# Altium PCB TYPEC_4KRECEIVER-v1.0.PcbDoc (part 12 of 12)
Units mil, origin at the board's own origin, x right, y up, seen from the top; angles counter-clockwise.
Board outline 2834.7 x 1259.84 mil, 10 copper layers (Top Layer, GND-1, Signal L1, GND-2, PWR-1, PWR-2, GND-3, Signal L2, GND-4, Bottom Layer), stack 61.686 mil thick; 492 components, 339 nets, 2214 pads, 1169 vias.
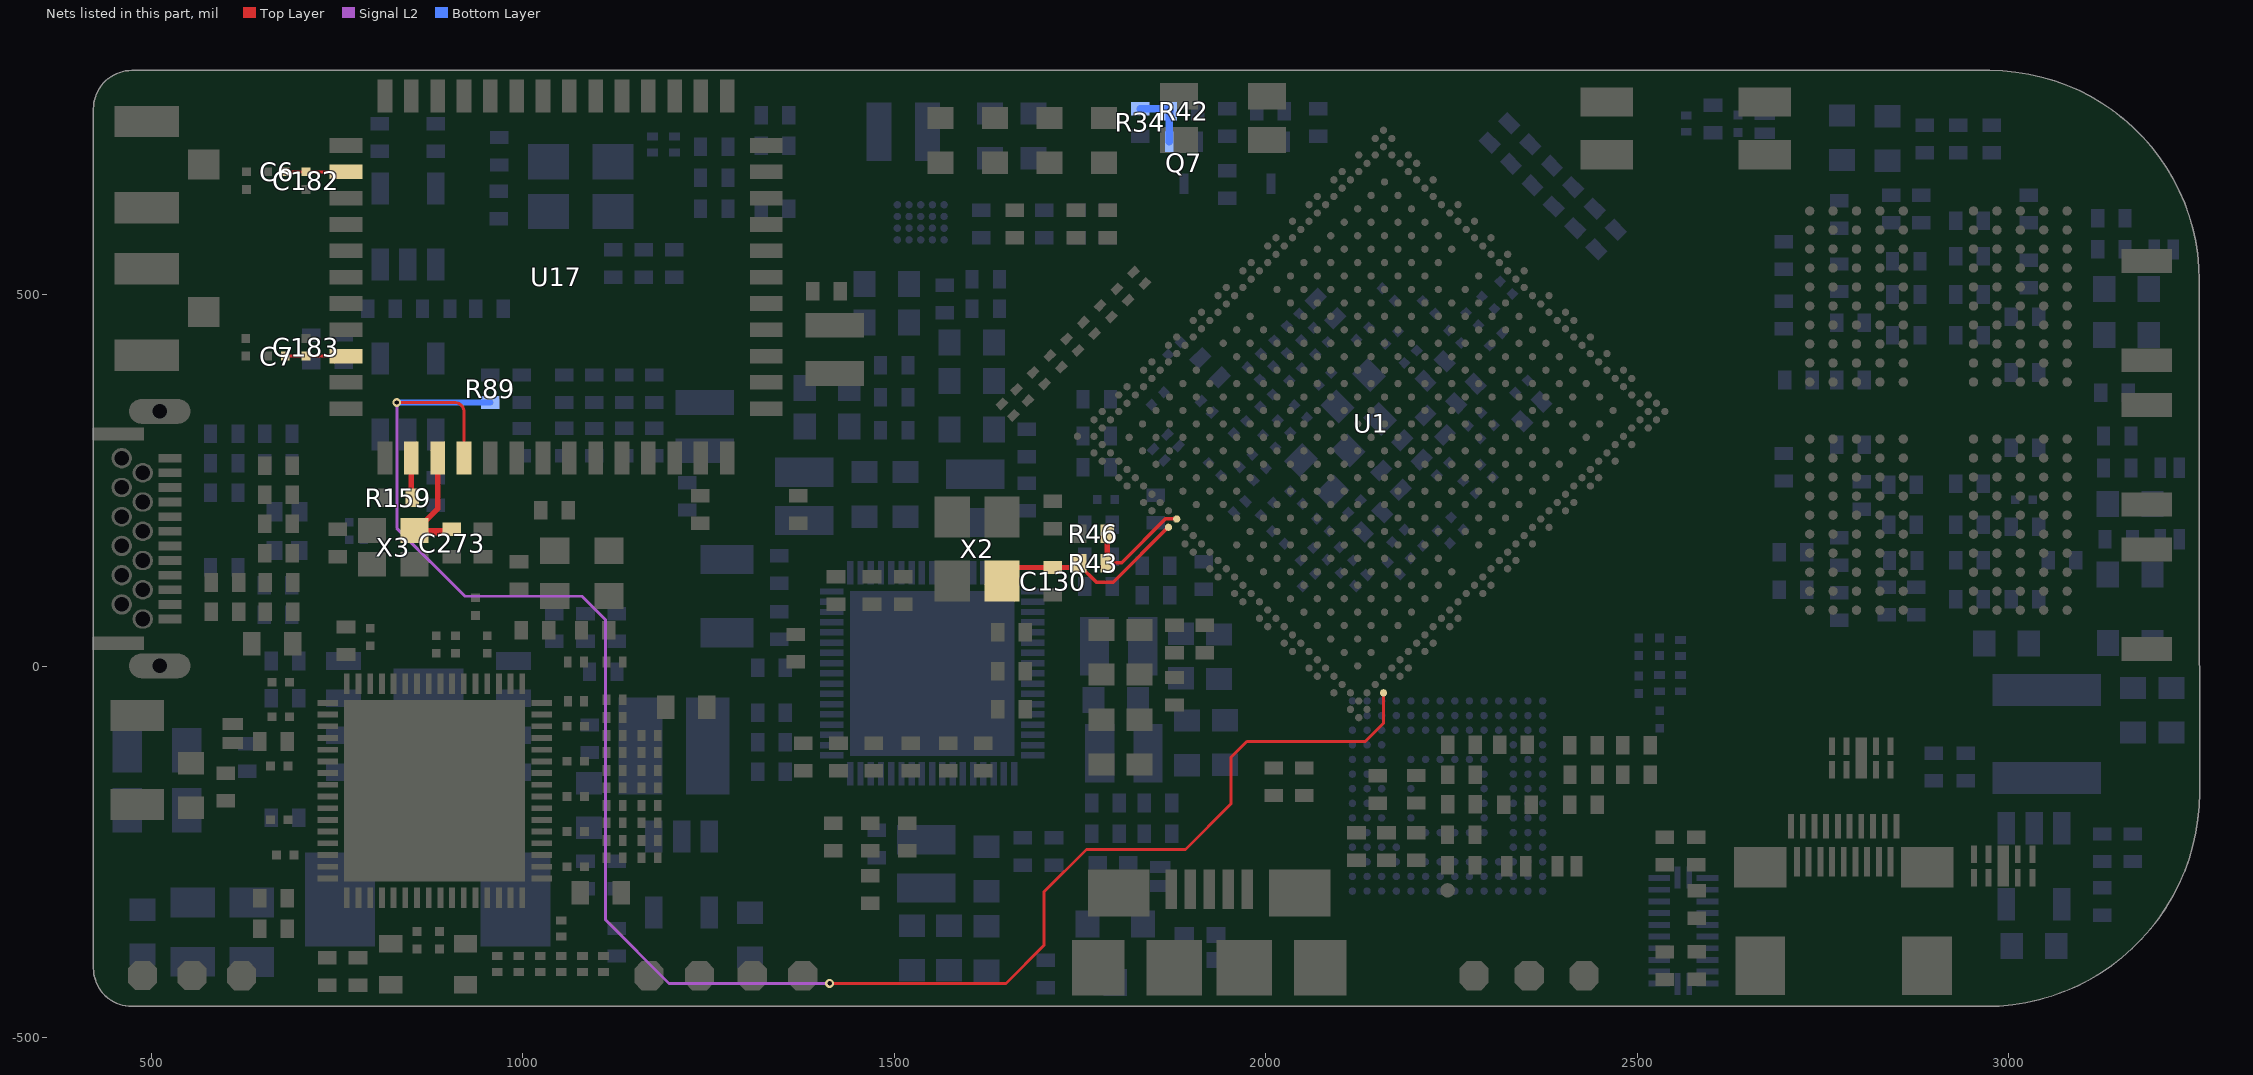
[diagram p17: the nets of this part, all layers, seen from the top]

## Via types
v1: diameter 11.81, hole 5.91, Top Layer to Bottom Layer, tented both sides, 698 vias
v2: diameter 15.75, hole 7.87, Top Layer to Bottom Layer, tented both sides, 248 vias
v3: diameter 11.81, hole 5.91, Top Layer to Signal L1, tented both sides, 121 vias
v4: diameter 11.81, hole 5.91, Top Layer to Bottom Layer, 44 vias
v5: diameter 11.81, hole 5.91, Signal L2 to Bottom Layer, 41 vias
v6: diameter 11.81, hole 5.91, Top Layer to Signal L1, 17 vias

## Nets (pads, with @x,y where several pads share a name; then routed paths per layer and width w, separated by ;. In a path a pad name is that pad's centre, name@x,y a point inside that pad or via, vN(x,y) a via of type N, cw(c..) or ccw(c..) an arc to the next point about the centre after c; other vN are vias at no path point) (continued)
WIFI_REG_ON: R89.2 U1.A35 U17.15 | length 2538.4
  Top Layer w4: v1(830.73,354.73) 908.64,354.73 cw(c908.64,342.29) 921.08,342.29 U17.15@921.08,279.73 ; v1(1413.13,-427.18) 1650.55,-427.18 1701.47,-376.26 1701.47,-304.35 1758.95,-246.87 1892.06,-246.87 1953.18,-185.74 1953.18,-123.23 1974.75,-101.66 2134.24,-101.66 2158.75,-77.15 U1.A35@2158.75,-36.08
  Signal L2 w4: v1(830.73,354.73) 830.73,185.55 922.4,93.87 1079.95,93.87 1111.74,62.08 1111.74,-341.94 1196.97,-427.18 v1(1413.13,-427.18)
  Bottom Layer w8: v1(830.73,354.73) R89.2@956.65,354.73
WIFI_XTAL_IN: R159.2 U17.13 | length 53.2
  Top Layer w7: R159.2@850.21,230.05 U17.13@850.21,279.73 ; R159.2@855.35,226.73 R159.2@855.35,230.23
WIFI_XTAL_OUT: C273.2 U17.14 X3.1 | length 156.6
  Top Layer w7: X3.1@854.4,182.15 856.37,182.15 885.65,211.44 U17.14@885.65,279.73
  Top Layer w10: X3.1@855.66,180.89 C273.2@900.64,180.89
WL_ANT0: C6.1 C182.2 U17.2 | length 81.6
  Top Layer w4.2: C6.1@680.6,665.16 C182.2@708.29,665.16 U17.2@762.22,665.16
WL_ANT1: C7.1 C183.2 U17.9 | length 81.6
  Top Layer w4.2: C7.1@680.6,417.13 C183.2@708.29,417.13 U17.9@762.22,417.13
WORK_LED: Q7.1 R34.1 R42.2 | length 82.8
  Bottom Layer w10: R34.1@1831.36,750.23 1867.63,750.23 R42.2@1871.01,746.85 ; Q7.1@1870.39,705.5 1870.39,745.49 R42.2@1871.63,746.73
XIN24M: R43.2 R46.1 U1.AD37 | length 156.4
  Top Layer w4: U1.AD37@1879.64,197.05 U1.AD37@1880.36,197.77
  Top Layer w4.7: R43.2@1789.13,139.07 1806.16,139.07 1864.98,197.89 U1.AD37@1880.24,197.89
  Top Layer w7: R46.1@1786.78,178.03 1786.78,141.42 R43.2@1789.13,139.07
XOUT24M: C130.2 R43.1 U1.AD38 X2.3 | length 275.7
  Top Layer w4.7: R43.1@1749.43,135.82 1772.37,112.88 1794.73,112.88 U1.AD38@1869.69,187.84
  Top Layer w7: X2.3@1645.25,114.22 1663.56,132.53 1744.28,132.53 1749.78,138.03 R43.1@1749.78,138.53
pads on no net: J2.4 J7.2 U1.1A4 U1.1A13 U1.1A15 U1.1A17 U1.1A18 U1.1B13 U1.1B17 U1.1B20 U1.1C2 U1.1C15 U1.1D2 U1.1D19 U1.1D20 U1.1E19 U1.1E20 U1.1F18 U1.1F19 U1.1H3 U1.1H19 U1.1H20 U1.1J19 U1.1J20 U1.1K19 U1.1K20 U1.1L1 U1.1L2 U1.1N1 U1.1N2 U1.1N20 U1.1P2 U1.1P3 U1.1P4 U1.1P18 U1.1R1 U1.1R2 U1.1R16 U1.1R17 U1.1R18 U1.1T1 U1.1T2 U1.1T4 U1.1T6 U1.1T18 U1.1T19 U1.1T20 U1.1U1 U1.1U3 U1.1U4 U1.1U5 U1.1U6 U1.1U7 U1.1U8 U1.1U9 U1.1U11 U1.1U19 U1.1U20 U1.1V2 U1.1V3 U1.1V6 U1.1V8 U1.1V9 U1.1V11 U1.1V15 U1.1V16 U1.1V20 U1.A22 U1.A26 U1.AA37 U1.AA38 U1.AB1 U1.AB2 U1.AB37 U1.AB38 U1.AC2 U1.AD1 U1.AE2 U1.AF1 U1.AF2 U1.AF37 U1.AG2 U1.AG37 U1.AH2 U1.AJ1 U1.AJ2 U1.AJ38 U1.AK2 U1.AK37 U1.AL1 U1.AL2 U1.AM1 U1.AM2 U1.AM37 U1.AM38 U1.AN2 U1.AN37 U1.AN38 U1.AP1 U1.AP3 U1.AP4 U1.AP5 U1.AP6 U1.AP7 U1.AP9 U1.AP10 U1.AP12 U1.AP14 U1.AP15 U1.AP17 U1.AP18 U1.AP20 U1.AP21 U1.AP23 U1.AP24 U1.AP26 U1.AP27 U1.AP29 U1.AP30 U1.AR2 U1.AR4 U1.AR6 U1.AR7 U1.AR9 U1.AR10 U1.AR14 U1.AR15 U1.AR17 U1.AR18 U1.AR20 U1.AR21 U1.AR23 U1.AR24 U1.AR26 U1.AR27 U1.AR29 U1.AR30 U1.B22 U1.B26 U1.C37 U1.D37 U1.G38 U1.J37 U1.J38 U1.K37 U1.K38 U1.M37 U1.M38 U1.N37 U1.N38 U1.T37 U1.V37 U1.V38 U1.W37 U1.W38 U1.Y1 U1.Y2 U2.14 U2.15 U2.16 U2.17 U2.19 U2.20 U2.21 U2.22 U3.A1 U3.A2 U3.A7 U3.A8 U3.A9 U3.A10 U3.A11 U3.A12 U3.A13 U3.A14 U3.B1 U3.B7 U3.B8 U3.B9 U3.B10 U3.B11 U3.B12 U3.B13 U3.B14 U3.C1 U3.C3 U3.C5 U3.C7 U3.C8 U3.C9 U3.C10 U3.C11 U3.C12 U3.C13 U3.C14 U3.D1 U3.D2 U3.D3 U3.D4 U3.D12 U3.D13 U3.D14 U3.E1 U3.E2 U3.E3 U3.E5 U3.E8 U3.E9 U3.E10 U3.E12 U3.E13 U3.E14 U3.F1 U3.F2 U3.F3 U3.F10 U3.F12 U3.F13 U3.F14 U3.G1 U3.G2 U3.G3 U3.G10 U3.G12 U3.G13 U3.G14 U3.H1 U3.H2 U3.H3 U3.H12 U3.H13 U3.H14 U3.J1 U3.J2 U3.J3 U3.J12 U3.J13 U3.J14 U3.K1 U3.K2 U3.K3 U3.K6 U3.K7 U3.K10 U3.K12 U3.K13 U3.K14 U3.L1 U3.L2 U3.L3 U3.L12 U3.L13 U3.L14 U3.M1 U3.M2 U3.M3 U3.M7 U3.M8 U3.M9 U3.M10 U3.M11 U3.M12 U3.M13 U3.M14 U3.N3 U3.N6 U3.N7 U3.N8 U3.N9 U3.N10 U3.N11 U3.N12 U3.N13 U3.N14 U3.P1 U3.P2 U3.P7 U3.P8 U3.P9 U3.P10 U3.P11 U3.P12 U3.P13 U3.P14 U7.32 U7.34 U7.39 U7.40 U7.41 U7.42 U7.43 U7.60 U12.A1 U12.A2 U12.A11 U12.A12 U12.AA1 U12.AA12 U12.AB1 U12.AB2 U12.AB11 U12.AB12 U12.B1 U12.B12 U12.G11 U12.K5 U12.K8 U12.N5 U12.N8 U17.12 U17.33 U17.35 U17.37 U17.44 U17.45 U17.46 U17.47 U17.48 U18.26 U18.36 U18.37 U18.44 U18.45 U18.51 U18.52 U18.61 U18.62

## Polygon pours and split planes (outlines as drawn)
VCCIO_FLASH on Signal L2 "VCCIO_FLASH_L08_P083" (solid, pour order 83): 2161.48,-106.72 2165.59,-110.83 2231.5,-110.83 2237.34,-116.67 2237.34,-193.42 2244.71,-200.79 2339.83,-200.79 2345.89,-194.73 2345.89,-68.17 2339.22,-61.5 2165.31,-61.5 2161.48,-65.33
GND on Signal L2 "GND_L08_P059" (solid, remove dead copper, pour order 59): 631.36,737.47 685.9,792.02 1240.03,792.02 1290.53,741.52 3034.41,741.52 3171.08,604.85 3171.08,-37.29 3158.57,-49.8 2506.85,-49.8 2506.85,-458.27 2969.38,-458.27 ccw(c2969.34,-170.57) 3257.05,-170.52 3257,171.83 3256.7,519.23 ccw(c2974.41,519.28) 2974.44,801.57 422.36,801.57 422.36,-458.27 631.36,-458.27 1173.48,-458.27 1173.48,-435.89 1072.65,-335.06 631.36,-335.06
VCCA_1V8 on Signal L2 "SIG6-VCCA_1V8" (solid, remove dead copper, pour order 35): 2021.43,225.31 2034.68,212.07 2046.38,212.07 2186.56,352.26 2246.69,352.26 2280.02,385.59 2280.02,422.37 2295.3,437.65 2368.23,364.72 2368.23,334.87 2351.29,334.87 2196.9,180.49 2197.36,180.04 2197.36,24.48 2189.07,16.2 2038,16.2 2028.98,25.23 2028.98,105.95 1959.47,175.46 1806.93,175.46 1806.93,225.31
VDDA_0V9 on Signal L2 "VDDA_0V9_L08_P069" (solid, pour order 69): 1988.26,262.52 2196.33,470.59 2255.54,470.59 2281.1,445.03 2280.02,443.95 2280.02,385.59 2219.9,385.59 2051.56,217.25 2033.53,217.25
VCC_3V3 on Signal L2 "SIG6-VCC_3V3" (solid, remove dead copper, pour order 36): 2119.85,427.53 2132.35,427.53 2202.35,497.53 2222.35,497.53 2274.85,445.03 2287.35,445.03 2309.85,467.53 2309.85,540.03 2207.35,642.53 2187.35,642.53 2107.16,562.33 2107.16,440.22
VCC3V3_SYS on Bottom Layer "VCC3V3_SYS_L10_P082" (solid, pour order 82): 1595.18,-265.47 1641.86,-265.47 1641.86,-222.47 1604.36,-184.97 1595.18,-184.97
VDD_NPU on Bottom Layer "Bottom Layer-VDD_NPU" (solid, remove dead copper, pour order 3): 1555.23,302.59 1568.57,289.25 1568.57,226.99 1648.25,226.99 1648.25,279.14 1629.67,279.14 1598.08,310.73 1598.08,442.47 1620.29,464.68 1620.29,554.88 1584.76,554.88 1584.76,490.58 1578.75,484.58 1555.23,484.58
GND on Bottom Layer "Bottom Layer-GND 3" (solid, remove dead copper, pour order 23): 1606.61,442.51 1606.61,313.96 1622.17,298.4 1647.49,298.4 1652.62,303.53 1652.62,449.95 1646.04,456.53 1620.62,456.53
NetL2_1 on Bottom Layer "Bottom Layer-$25N1148" (solid, remove dead copper, pour order 12): 1457.74,602.01 1460.28,599.47 1523.09,599.47 1525.57,601.95 1525.57,639.15 1517.36,647.36 1517.36,758.53 1457.74,758.53
GND on Bottom Layer "GND_L10_P071" (solid, remove dead copper, pour order 71): 422.36,-406.75 ccw(c473.88,-406.75) 473.88,-458.27 2969.38,-458.27 ccw(c2969.34,-170.56) 3257.05,-170.52 3257,171.83 3256.7,519.23 ccw(c2974.4,519.27) 2974.44,801.57 473.88,801.57 ccw(c473.88,750.05) 422.36,750.05
VCC3V3_SYS on Bottom Layer "VCC3V3_SYS_L10_P079" (solid, pour order 79): 1425.67,186.07 1450.03,186.07 1462.73,173.37 1475.66,173.37 1479.43,177.15 1479.43,226.42 1425.67,226.42
VCC_3V3 on Bottom Layer "Bottom Layer-VCC_3V3" (solid, remove dead copper, pour order 6): 1484.78,180.22 1478.04,173.48 1478.04,132.6 1486.82,132.6 1486.82,146.02 1507.2,166.4 1509.23,166.4 1509.39,166.56 1530.8,166.56 1532.68,168.44 1532.68,226.42 1484.78,226.42
NetL7_2 on Bottom Layer "Bottom Layer-$26N2279" (solid, remove dead copper, pour order 25): 1503.81,-209.58 1521.23,-192.17 1543.29,-192.17 1560.72,-174.74 1560.72,-129.46 1569.5,-129.46 1569.5,-168.97 ccw(c1593.84,-168.97) 1586.44,-192.17 1586.44,-265.47 1503.81,-265.47
VCCA_1V8 on Bottom Layer "VCCA_1V8_L10_P002" (solid, pour order 2): 1736.98,126.26 1745.24,134.53 1766.76,134.53 1775.22,134.53 1775.22,164.47 1914.08,164.47 1914.08,210.41 1838.83,210.41 1830.59,218.65 1807.74,218.65 1807.74,172.71 1720.92,172.71 1720.92,90.41 1707.05,76.54 1686.51,76.54 1686.51,68.99 1711.05,68.99 1736.98,94.92
NetL6_2 on Bottom Layer "Bottom Layer-$26N1977" (solid, remove dead copper, pour order 1): 1569.77,171.55 1579.47,161.85 1604.59,161.85 1620.75,145.69 1648.43,173.36 1648.43,222.3 1569.77,222.3
VCC3V3_SYS on Bottom Layer "VCC3V3_SYS_L10_P032" (solid, pour order 32): 1718.37,68.58 1713.04,63.26 1670.76,63.26 1670.76,50.68 1727.14,50.68 1727.14,68.58
VCC_1V8 on Bottom Layer "Bottom Layer-VCC_1V8" (solid, remove dead copper, pour order 9): 1334.18,225.12 1418.55,225.12 1418.55,280.56 1399.49,299.63 1399.49,424.49 1394.34,429.63 1349.11,429.63 1344.18,424.7 1344.18,314.58 1334.18,304.58
GND on Bottom Layer "GND_L10_P068" (solid, pour order 68): 448.03,-358.23 800.32,-358.23 819.36,-377.27 819.36,-458.27 468.8,-458.27 448.03,-437.5
VCC3V3_SYS on Bottom Layer "VCC3V3_SYS_L10_P065" (solid, pour order 65): 1340.01,-22.94 1364.09,-22.94 1368.76,-18.27 1368.76,4.15 1386.53,21.92 1431.78,21.92 1431.78,13.26 1395.8,13.26 1383.04,0.51 1383.04,-59.71 1363.05,-79.71 1340.01,-79.71 1340.01,-67.8
VCC5V0_SYS on Bottom Layer "Bottom Layer-VCC5V0_SYS 1" (solid, remove dead copper, pour order 11): 1404.93,594.84 1404.93,535.2 1479.41,535.2 1479.41,425.75 1472.68,419.02 1472.68,392.53 1490.68,392.53 1490.68,417.53 1495.06,421.9 1531.24,421.9 1535.18,425.84 1535.18,531.47 1525.57,541.08 1525.57,592.37 1523.1,594.84
VDD_LOGIC on Bottom Layer "Bottom Layer-VDD_LOGIC" (solid, remove dead copper, pour order 24): 1894.95,-160.24 1850.13,-160.24 1813.38,-160.24 1813.38,-72.65 1861.35,-72.65 1861.35,-99.99 1958.46,-99.99 1963.09,-104.62 1963.09,-155.04 1957.89,-160.24
VCC5V0_SYS on Bottom Layer "VCC5V0_SYS_L10_P000" (solid, pour order 0): 782.47,-66.51 517.18,-66.51 517.18,-245.87 641.81,-245.87 641.81,-157.63 600.09,-157.63 600.09,-123.92 782.47,-123.92
VCC0V6_DDR on Bottom Layer "VCC0V6_DDR_L10_P054" (solid, pour order 54): 2978.52,2.63 3178.82,2.63 3178.82,98.85 3247.36,98.85 3247.36,-57.16 2978.52,-57.16
NetL5_1 on Bottom Layer "Bottom Layer-$26N4974" (solid, remove dead copper, pour order 5): 1452.84,180.22 1459.14,173.91 1459.14,152.74 1459.14,125.27 1450.48,125.27 1450.48,146.12 1441.48,155.13 1378.1,155.13 1362.33,170.9 1338.06,170.9 1334.18,174.77 1334.18,217.43 1418.55,217.43 1418.55,180.22
VCC3V3_SYS on Bottom Layer "VCC3V3_SYS_L10_P004" (solid, pour order 4): 448.03,-344.58 687.51,-344.58 687.51,-377.27 819.36,-377.27 819.36,-251.28 448.03,-251.28
NetL10_1 on Bottom Layer "NETL10_1_L10_P053" (solid, pour order 53): 3043.51,-181.19 cw(c3043.51,-190.86) 3053.18,-190.87 3053.18,-240.57 3108.89,-240.57 3108.89,-199.13 3126.19,-181.83 3126.19,-128.97 2978.52,-128.97 2978.52,-181.19
VCC3V3_PMU on Bottom Layer "VCC3V3_PMU_L10_P044" (solid, pour order 44): 1460.2,-173.31 1468.61,-164.91 1478.04,-164.91 1478.04,-129.46 1487.79,-129.46 1487.79,-200.17 1454.32,-200.17 1454.32,-187.37 1460.2,-181.72
VDD_CPU on Bottom Layer "Bottom Layer-VDD_CPU" (solid, remove dead copper, pour order 22): 1528.1,758.53 1528.1,648 1531.83,644.27 1708.3,644.27 1712.36,648.33 1712.36,707.06 1706.98,712.43 1607.39,712.43 1601.74,718.09 1601.74,758.53
NetL4_2 on Bottom Layer "Bottom Layer-$26N1792" (solid, remove dead copper, pour order 31): 1716.91,-5.64 1750.02,27.47 1750.02,65.84 1796.39,65.84 1796.39,-14.3 1714.91,-14.3 1702.59,-14.3 1670.76,-14.3 1670.76,-5.64
VDD_GPU on Bottom Layer "Bottom Layer-VDD_GPU" (solid, remove dead copper, pour order 28): 1950.42,17.45 1954.68,21.72 1954.68,62.24 1951.08,65.84 1890.23,65.84 1884.54,71.52 1884.54,147.53 1854.3,147.53 1854.3,71.94 1848.2,65.84 1813.38,65.84 1813.38,-14.3 1854.3,-14.3 1854.3,17.45
NetL3_2 on Bottom Layer "Bottom Layer-$26N670" (solid, remove dead copper, pour order 26): 1707.76,-55.64 1686.51,-55.64 1686.51,-46.98 1724.24,-46.98 1750.59,-73.32 1796.39,-73.32 1796.39,-160.24 1753.75,-160.24 1753.75,-101.63
VCC3V3_SYS on Bottom Layer "Bottom Layer-VCC3V3_SYS 1" (solid, remove dead copper, pour order 27): 1726.66,-41.86 1670.76,-41.86 1670.76,-19.42 1716.15,-19.42 1796.39,-19.42 1796.39,-67.71 1752.51,-67.71
GND on Top Layer "GND_L01_P075" (solid, remove dead copper, pour order 75): 422.36,-406.75 ccw(c473.88,-406.75) 473.88,-458.27 2969.38,-458.27 ccw(c2969.34,-170.56) 3257.05,-170.52 3257,171.83 3256.7,519.23 ccw(c2974.4,519.27) 2974.44,801.57 473.88,801.57 ccw(c473.88,750.05) 422.36,750.05
GND on Top Layer "Top Layer-GND 1" (solid, remove dead copper, pour order 33): 1740.18,-88.15 1747.06,-95.03 1845.18,-95.03 1850.18,-90.03 1850.18,1.31 1847.01,4.48 1744.45,4.48 1740.18,0.21
VCCA1V8_PMU on Top Layer "VCCA1V8_PMU_L01_P047" (solid, pour order 47): 1667.68,-19.77 1667.68,27.72 1686.5,27.72 1709.39,50.62 1727.14,50.62 1727.14,17.21 1690.16,-19.77
GND on Top Layer "Top Layer-GND 4" (solid, remove dead copper, pour order 62): 1538.47,722.53 1803.11,722.53 1803.11,778.71 1797.05,784.77 1544.06,784.77 1538.47,779.18
VCC3V3_SYS on Top Layer "VCC3V3_SYS_L01_P017" (solid, pour order 17): 1489.36,226.42 1489.36,162.72 1504.82,162.72 1504.82,147.2 1489.36,147.2 1489.36,111.1 1444.45,111.1 1444.45,139.1 1418.55,139.1 1418.55,226.42
VCC_3V3 on Top Layer "VCC_3V3_L01_P014" (solid, pour order 14): 2461.64,-439.11 2470.63,-448.1 2497.32,-448.1 2609.6,-448.1 2609.6,-412.77 2514.93,-412.77 2504.21,-402.05 2504.21,-367.1 2515.54,-355.77 2609.6,-355.77 2609.6,-330.34 2414.79,-330.34 2414.79,-301.15 2378.51,-301.15 2378.51,-370.05 2447.4,-370.05 2461.64,-384.29
USB_5V on Top Layer "USB_5V_L01_P019" (solid, pour order 19): 506.99,112.84 553.97,112.84 553.97,132.02 506.99,132.02 506.99,210.92 553.97,210.92 553.97,229.71 422.36,229.71 422.36,102.55 506.99,102.55
VDD_CPU on Top Layer "Top Layer-VDD_CPU" (solid, remove dead copper, pour order 18): 1538.47,697.8 1538.47,648.29 1543.01,643.76 1723.29,643.76 1727.86,639.2 1727.86,599.59 1732.36,595.09 1798.49,595.09 1803.11,599.7 1803.11,697.8
VCC3V3_SYS on Top Layer "VCC3V3_SYS_L01_P039" (solid, pour order 39): 1669.68,33.17 1688.07,33.17 1709.93,55.03 1727.14,55.03 1727.14,76.54 1697.56,76.54 1669.68,48.67
VDD_LOGIC on Top Layer "Top Layer-VDD_LOGIC" (solid, remove dead copper, pour order 38): 1745.45,-100.7 1740.18,-105.97 1740.18,-161.54 1860.33,-161.54 1860.33,-105.47 1855.56,-100.7
VDD_GPU on Top Layer "Top Layer-VDD_GPU" (solid, remove dead copper, pour order 34): 1843.9,72.46 1850.18,66.17 1850.18,13.13 1847.03,9.97 1743.49,9.97 1740.18,13.28 1740.18,67.03 1745.61,72.46
VCC12_R on GND-1 "VCC12_R_L02_P081" (solid, pour order 81): 1066.99,-119.1 1072.73,-124.84 1072.65,-152.5 1072.65,-315.14 1067.78,-320.02 1018.94,-320.02 1014.14,-315.21 1014.14,-125.16 1020.2,-119.1
GND on GND-1 "GND_L02_P070" (solid, pour order 70): 422.36,-406.75 ccw(c473.88,-406.75) 473.88,-458.27 2969.38,-458.27 ccw(c2969.34,-170.56) 3257.05,-170.52 3257,171.83 3256.7,519.23 ccw(c2974.4,519.27) 2974.44,801.57 473.88,801.57 ccw(c473.88,750.05) 422.36,750.05
VDD_NPU on PWR-2 "VCC7-VDD_NPU" (solid, remove dead copper, pour order 41): 1701.27,392.93 2046.97,47.23 2303.67,47.23 2013.49,337.41 1953.58,277.51 1668.73,562.36 1577.65,562.36 1577.65,411.53 1596.25,392.93
VCC0V6_DDR on PWR-2 "VCC7-VCC0V6_DDR" (solid, remove dead copper, pour order 46): 2811.61,-44.59 3257,-44.59 3257,533.1 3248.58,587.91 3235.23,627.27 3216.85,664.54 3192.65,698.33 3174.05,718.86 3131.27,753.97 3095.28,774.76 3056.39,789.4 3029.52,796.14 2961.7,801.57 1620.06,801.57 1711.25,710.38 2178.52,710.38 2178.52,332.59 2463.81,47.3 2719.72,47.3
VCC3V3_SYS on PWR-2 "VCC3V3_SYS_L06_P078" (solid, pour order 78): 2102.75,31.82 2717.94,31.82 2806.92,-57.16 3257.04,-57.16 3255.67,-58.53 3255.67,-198.72 3240.57,-267.57 3200.74,-342.13 3140.39,-401.91 3079.48,-436.36 2997.58,-456.88 2948.38,-458.27 2614.91,-458.27 2614.91,-96.67 2482.45,-96.67 2421.12,-35.33 2140.78,-35.33 2099.88,-76.24 1693.75,-76.24 1682.61,-65.1 1682.61,31.82 1694.75,43.96 1694.75,179.17 1682.61,191.31 1601.9,272.02 1751.61,272.02 1991.82,31.82
VCC3V3_SYS on PWR-2 "VCC3V3_SYS_L06_P061" (solid, pour order 61): 1617.95,-198.7 1671.47,-252.21 1671.47,-324.48 1696.16,-349.17 2409.57,-349.17 2456.52,-349.17 2479.53,-326.15 2479.53,-210.92 2974.44,-210.92 2974.44,-458.27 458.08,-458.27 422.36,-422.55 422.36,-95.95 686.07,-95.95 706.06,-75.96 706.06,801.57 1432.85,801.57 1432.85,330.68 1617.95,145.58
VDD_CPU on PWR-2 "VCC7-VDD_CPU" (solid, remove dead copper, pour order 40): 2319.12,47.23 2446.84,47.23 2160.91,333.16 2160.91,714.9 1840.5,714.9 1840.5,693.31 1538.27,693.31 1530.89,685.93 1530.89,634.28 1705.23,634.28 2005.57,333.94 2018.84,347.52
USB_5V on PWR-2 "USB_5V_L06_P021" (solid, pour order 21): 422.36,798.8 695.29,798.8 695.29,-69.19 680.08,-84.4 422.36,-84.4
VCC3V3_PMU on PWR-2 "VCC3V3_PMU_L06_P042" (solid, pour order 42): 1675.83,570.31 1577.65,570.31 1577.65,610.05 1696.67,610.05 1987.54,319.17 1957.25,288.88
VCC5V0_SYS on PWR-1 "VCC5V0_SYS_L05_P072" (solid, pour order 72): 706.99,158.63 1189.02,158.63 1327.97,297.58 1327.97,602.01 1453.5,602.01 1453.5,193.54 1432.78,172.82 1432.78,137.44 1432.78,-181.2 1471.24,-219.67 1492.33,-219.67 1492.33,-351.78 1519.15,-378.6 2401.07,-378.6 2603.85,-175.82 3137.65,-175.82 3152.31,-190.48 3152.31,-391.96 3140.97,-401.91 3092.54,-430.95 3039.37,-449.98 2983.52,-458.27 460.83,-458.27 422.36,-419.8 422.36,-98.91 685.09,-98.91 706.99,-77.01
VCCIO_WL on PWR-1 "VCCIO_WL_L05_P080" (solid, pour order 80): 707.14,801.57 1314.93,801.57 1314.93,302.3 1184.45,171.83 707.14,171.83
USB_5V on PWR-1 "USB_5V_L05_P073" (solid, pour order 73): 695.29,801.57 695.29,-72.06 680.34,-87.01 422.36,-87.01 422.36,801.57
VDD_GPU on PWR-1 "VCC4-VDD_GPU" (solid, remove dead copper, pour order 45): 1804.52,279.65 1842.11,279.65 1859.13,262.63 1859.13,172.64 1846.03,159.55 1806.48,159.55 1763.99,117.06 1763.99,93.9 1799.28,93.9 1809.26,83.92 1809.26,8.8 1809.26,-69.29 1932.18,-69.29 2044.98,43.5 2044.98,271.55 2165.81,392.38 2165.81,506.78 2056.09,506.78 2005.85,456.53 1842.94,456.89 1799.28,413.22 1799.28,284.89
VCC_DDR on PWR-1 "VCC4-VCC_DDR" (solid, remove dead copper, pour order 58): 3020.69,721.22 cw(c3020.69,589.6) 3152.31,589.6 3152.31,250.54 3134.54,232.77 2977.61,232.77 2968.1,223.26 2968.58,222.78 2968.58,128.57 2985.58,111.57 3140.49,111.57 3152.31,99.75 3152.31,-112.67 3130.81,-134.17 2622.82,-134.17 2389.88,-367.1 1525.68,-367.11 1504.49,-345.91 1504.49,-219.67 1629.73,-219.67 1684.86,-274.8 2250.04,-274.8 2277.8,-247.03 2277.8,215.95 2260.66,233.09 2260.66,695.11 2286.78,721.22
VCC1V8_DDR on PWR-1 "VCC1V8_DDR_L05_P013" (solid, pour order 13): 2977.71,134.95 2989.36,123.3 3137.78,123.3 3152.31,137.82 3152.31,209.11 3135.79,225.64 2982.82,225.64 2977.71,220.52
VCC_3V3 on PWR-1 "VCC4-VCC_3V3" (solid, remove dead copper, pour order 60): 1778.53,422.87 1778.53,394.81 1798.26,374.97 1798.26,-173.02 2262.36,-173.02 2262.36,-241.42 2241.56,-262.21 1687.53,-262.21 1634.99,-209.67 1504.03,-209.67 1492.65,-198.29 1492.65,-164.75 1470.43,-139.03 1470.43,154.69 1492.65,176.91 1492.65,502.86 1510.04,521.8 1656.89,521.8 1656.89,612.14 1327.97,612.14 1327.97,797.78 1432.06,797.78 1432.06,736.7 1454.06,714.7 1454.27,714.9 2251.13,714.9 2251.13,515.22 2051.45,515.22 2012.63,476.4 1832.06,476.4
VDD_LOGIC on PWR-1 "VCC4-VDD_LOGIC" (solid, remove dead copper, pour order 29): 1809.26,-162.41 2240.87,-162.41 2250.61,-152.67 2250.61,504.67 2172.14,504.67 2172.14,388.73 2054.97,271.56 2054.97,37.69 1937.57,-79.71 1809.26,-79.71
GND on GND-2 "GND_L04_P051" (solid, pour order 51): 422.36,-406.75 ccw(c473.88,-406.75) 473.88,-458.27 2969.38,-458.27 ccw(c2969.34,-170.56) 3257.05,-170.52 3257,171.83 3256.7,519.23 ccw(c2974.4,519.27) 2974.44,801.57 473.88,801.57 ccw(c473.88,750.05) 422.36,750.05
GND on Signal L1 "GND_L03_P077" (solid, remove dead copper, pour order 77): 726.43,364.8 804.94,443.31 804.94,514.76 804.94,674.37 846.73,716.16 872.39,716.16 1216.16,716.16 1216.16,801.57 422.36,801.57 422.36,-458.27 631.36,-458.27 2983.52,-458.27 3052.9,-445.87 3129.22,-409.76 3200.74,-342.13 3235.17,-280.63 3257.05,-184.66 3257.05,533.1 3248.58,587.91 3226.04,645.9 3201.45,687.61 3174.05,716.16 3131.27,753.97 3056.39,789.4 2981.38,801.57 1216.16,801.57 1216.16,722.86 2286.97,722.86 2784.19,722.86 2812.22,750.89 2981.91,750.89 cw(c2981.92,567.04) 3165.77,567.03 3165.77,-51.24 2669.86,-51.24 2669.86,-203.62 2496.67,-203.62 2496.67,-345.34 644.78,-345.34 622.27,-322.82 622.27,332.09 654.98,364.8
VCC3V3_SYS on Signal L1 "VCC3V3_SYS_L03_P074" (solid, pour order 74): 1694.61,212.25 1694.61,146.91 1683.04,135.33 1429.92,135.33 1418.55,146.71 1418.55,217.43 1428.3,227.18 1679.68,227.18
GND on GND-3 "GND_L07_P050" (solid, pour order 50): 422.36,-406.75 ccw(c473.88,-406.75) 473.88,-458.27 2969.38,-458.27 ccw(c2969.34,-170.56) 3257.05,-170.52 3257,171.83 3256.7,519.23 ccw(c2974.4,519.27) 2974.44,801.57 473.88,801.57 ccw(c473.88,750.05) 422.36,750.05
GND on GND-4 "GND_L09_P049" (solid, pour order 49): 422.36,-406.75 ccw(c473.88,-406.75) 473.88,-458.27 2969.38,-458.27 ccw(c2969.34,-170.56) 3257.05,-170.52 3257,171.83 3256.7,519.23 ccw(c2974.4,519.27) 2974.44,801.57 473.88,801.57 ccw(c473.88,750.05) 422.36,750.05

## Other copper
Top Layer:
  region net LANE2_TX1_N: 751.21,-154.99 717.75,-154.99 717.75,-163.84 751.21,-163.84
  rectangle net GND: 1305.82,478.14 1372.45,497.83
  rectangle net GND: 1220.47,371.85 1369.48,391.54
  rectangle net GND: 1044.76,-347.67 1059.33,-330.01
  rectangle net GND: 1077.5,-87.12 1091.92,-75.31
  region net VCC12_R: 1065.69,-75.31 1049.08,-75.31 1049.08,-87.12 1065.69,-87.12
  region net VCC12_R: 1065.69,-216.99 1049.08,-216.99 1049.08,-228.8 1065.69,-228.8
  region net VCC33_R: 1065.69,-169.74 1049.08,-169.74 1049.08,-181.55 1065.69,-181.55
  region net VCC12_R: 1065.69,-122.19 1049.08,-122.19 1049.08,-134 1065.69,-134
  region net #TX2_P: 1187.22,-85.96 1176.59,-85.96 1176.59,-100.98 1187.22,-100.98
  region net #TX2_N: 1187.22,-108.98 1176.59,-108.98 1176.59,-124 1187.22,-124
  region net #TX1_P: 2813.58,-243.83 2804.71,-243.83 2804.71,-283.2 2813.58,-283.2
  region net #TX1_P: 1187.22,-133.21 1176.59,-133.21 1176.59,-148.23 1187.22,-148.23
  rectangle net #TX1_N: 2789.96,-283.2 2798.84,-243.83
  region net #TX1_N: 1187.22,-156.23 1176.59,-156.23 1176.59,-171.25 1187.22,-171.25
  region net #TX0_P: 1187.22,-180.45 1176.59,-180.45 1176.59,-195.47 1187.22,-195.47
  rectangle net #TX0_N: 1176.59,-218.49 1187.22,-203.47
  region net #CLK_P: 2766.34,-243.83 2757.47,-243.83 2757.47,-283.2 2766.34,-283.2
  region net #CLK_P: 1187.22,-227.57 1176.59,-227.57 1176.59,-242.59 1187.22,-242.59
  rectangle net #CLK_N: 2742.72,-283.2 2751.6,-243.83
  rectangle net #CLK_N: 1176.59,-265.61 1187.22,-250.59
  rectangle net VDD12: 851.84,-363.32 863.65,-346.94
  rectangle net VCC33_R: 1172.49,-71.33 1204.69,-20.71
  rectangle net VCC33_IO: 882.36,-363.32 894.17,-346.94
  rectangle net VCC12_R: 1053.11,-320.75 1071.69,-264.23
  rectangle net VCC12_R: 1053.11,-320.87 1095.31,-288.67
  rectangle net VCC12_R: 1013.63,-80.94 1036.55,-65.42
  rectangle net TMDS_D2_P: 1107.75,-101.11 1118.38,-86.09
  region net TMDS_D2_N: 1118.38,-108.86 1107.75,-108.86 1107.75,-123.88 1118.38,-123.88
  rectangle net TMDS_D1_P: 1107.75,-148.23 1118.38,-133.21
  region net TMDS_D1_N: 1118.38,-156.1 1107.75,-156.1 1107.75,-171.13 1118.38,-171.13
  rectangle net TMDS_D0_P: 1107.75,-195.47 1118.38,-180.45
  region net TMDS_D0_N: 1118.38,-203.34 1107.75,-203.34 1107.75,-218.37 1118.38,-218.37
  rectangle net TMDS_CLK_P: 1107.75,-242.71 1118.38,-227.69
  region net TMDS_CLK_N: 1118.38,-250.46 1107.75,-250.46 1107.75,-265.48 1118.38,-265.48
  rectangle net NetC321_1: 877.91,11.23 892.81,23.04
  region net NetC320_1: 915.71,23.04 900.8,23.04 900.8,11.23 915.71,11.23
  region net LANE3_RX1_P: 751.21,-280.97 717.75,-280.97 717.75,-289.82 751.21,-289.82
  rectangle net LANE3_RX1_N: 717.75,-275.04 751.21,-266.2
  rectangle net LANE2_TX1_P: 681.35,61.14 699.35,88.33
  rectangle net LANE2_TX1_P: 717.75,-149.06 751.21,-140.22
  rectangle net LANE2_TX1_N: 681.36,97.69 699.36,124.89
  rectangle net LANE1_TX2_P: 717.75,-54.57 751.21,-45.73
  region net LANE1_TX2_N: 751.21,-60.5 717.75,-60.5 717.75,-69.35 751.21,-69.35
  region net LANE0_RX2_P: 751.21,-186.48 717.75,-186.48 717.75,-195.33 751.21,-195.33
  rectangle net LANE0_RX2_N: 717.75,-180.55 751.21,-171.71
  rectangle net TX1_P: 509.61,76.97 543.1,89.78
  rectangle net TX1_N: 509.61,95.65 543.1,108.46
  rectangle net RX2_P: 509.61,253.08 543.1,265.94
  rectangle net RX2_N: 509.61,234.45 543.1,247.34
  rectangle net VCC_WL: 1296.42,690.75 1337.65,789.27
  region net VCC_1V2: 1144.43,-288.67 1111.18,-288.67 1111.18,-320.87 1144.43,-320.87
  rectangle net VCC_1V2: 805.96,-440.79 839.16,-414.67
  rectangle net USB_5V: 490.73,214.76 527.36,226.57
  rectangle net USB_5V: 445.53,-87.27 623.32,-23.81
  rectangle net NetR51_2: 1232.9,229.23 1246.53,279.73
  rectangle net NetL9_2: 1380.46,376.97 1459.2,426.97
  rectangle net NetC167_2: 1305.82,442.72 1419.83,462.4
  region net LPDDR4_DQS0_B_N: 2420.35,212.64 2413.28,219.71 2410.8,217.23 2417.88,210.16
  rectangle net VCC_DDR: 1509.37,-330.66 1575.3,-287.72
  rectangle net VCC_3V3: 2150.21,-233.45 2178.97,-215.45
  rectangle net VCC_3V3: 2534.27,-426.67 2581.35,-416.36
  rectangle net VCC_1P8D: 1355.18,33.48 1384.49,62.11
  region net VCC5V0_SYS: 973.11,-406.8 958.54,-406.8 958.54,-426.95 973.11,-426.95
  rectangle net VCC5V0_SYS: 1438.14,-230.73 1480.18,-202.51
  rectangle net VCC5V0_SYS: 445.53,-249.32 623.32,-165.86
  region net VCC3V3_SYS: 1087.73,-406.8 1073.16,-406.8 1073.16,-426.95 1087.73,-426.95
  region net VCC3V3_SYS: 1002.11,-406.8 987.54,-406.8 987.54,-426.95 1002.11,-426.95
  rectangle net VCC3V3_SYS: 932.9,174.12 1004.35,222.38
  rectangle net VCC3V3_SYS: 516.65,-324.72 623.32,-256.69
  rectangle net VCC3V3_SYS: 906.48,-440.79 939.68,-414.67
  rectangle net VCC3V3_SYS: 765.9,-438.79 790.9,-414.67
  rectangle net VCC3V3_PMU: 1633.87,551.39 1674.86,598.73
  rectangle net VCC3V3_PMU: 1633.87,567.53 1674.86,598.73
  rectangle net NetC5_2: 1265.57,257.58 1315.43,301.87
  rectangle net HDMI_TXCLK_P: 1129.4,-242.71 1140.03,-227.69
  region net HDMI_TXCLK_P: 1803.83,518.93 1797.33,518.93 1797.33,509.13 1803.83,509.13
  region net HDMI_TXCLK_P: 1165.56,-227.57 1154.93,-227.57 1154.93,-242.59 1165.56,-242.59
  region net HDMI_TXCLK_N: 1140.03,-250.46 1129.4,-250.46 1129.4,-265.48 1140.03,-265.48
  rectangle net HDMI_TXCLK_N: 1154.94,-265.61 1165.57,-250.59
  region net HDMI_TX2_P: 1165.56,-85.96 1154.93,-85.96 1154.93,-100.98 1165.56,-100.98
  rectangle net HDMI_TX2_P: 1129.4,-101.11 1140.03,-86.09
  rectangle net HDMI_TX2_N: 1154.94,-124 1165.57,-108.98
  region net HDMI_TX2_N: 1140.03,-108.86 1129.4,-108.86 1129.4,-123.88 1140.03,-123.88
  rectangle net HDMI_TX1_P: 1129.4,-148.36 1140.03,-133.34
  region net HDMI_TX1_P: 1165.56,-133.21 1154.93,-133.21 1154.93,-148.23 1165.56,-148.23
  region net HDMI_TX1_N: 1140.03,-156.1 1129.4,-156.1 1129.4,-171.13 1140.03,-171.13
  rectangle net HDMI_TX1_N: 1154.94,-171.25 1165.57,-156.23
  rectangle net HDMI_TX0_P: 1129.4,-195.6 1140.03,-180.58
  region net HDMI_TX0_P: 1165.56,-180.45 1154.93,-180.45 1154.93,-195.47 1165.56,-195.47
  region net HDMI_TX0_N: 1140.03,-203.34 1129.4,-203.34 1129.4,-218.37 1140.03,-218.37
  rectangle net HDMI_TX0_N: 1154.94,-218.49 1165.57,-203.47
  rectangle net GND: 2247.59,576.17 2263.28,583.18
  region net GND: 2162.01,661.78 2156.05,667.73 2142.97,654.64 2148.92,648.69
  rectangle net GND: 2135.37,647.41 2160.14,651.64
  rectangle net GND: 2821.46,-296.52 2829.33,-263.51
  rectangle net GND: 2726.97,-296.52 2734.84,-263.51
  rectangle net GND: 2630.51,-442.64 2701.38,-243.83
  rectangle net GND: 2630.51,-442.64 2923.93,-409.35
  rectangle net GND: 2632.48,-442.64 2699.41,-355.49
  rectangle net GND: 2268.58,-198.78 2291,-93.33
  rectangle net GND: 2273.1,-204.97 2282.5,-188.81
  rectangle net GND: 1305.82,549.02 1372.26,568.7
  rectangle net GND: 726.36,690.75 784.37,793.61
  rectangle net GND: 450.87,303.35 537.48,777.73
  region net GND: 1194.95,301.87 1194.95,233.17 1214.64,233.17 1214.64,301.87
  rectangle net GND: 1565.33,-74.41 1641.68,54.26
  rectangle net GND: 1355.18,-3.52 1384.49,23.98
  rectangle net GND: 738.57,174.89 816.01,198.89
  rectangle net GND: 483.64,-6.14 543.1,69.09
  rectangle net GND: 1077.5,-228.8 1091.92,-216.99
  rectangle net GND: 1077.5,-86.62 1091.92,-75.96
  rectangle net GND: 1077.5,-134 1091.92,-122.19
  rectangle net GND: 1077.5,-181.55 1091.92,-169.74
  rectangle net GND: 1077.5,-276.04 1091.92,-264.23
  rectangle net GND: 445.53,-154.04 623.32,-95.54
  rectangle net GND: 654.8,-212.92 666.61,-128.81
  region net GND: 863.69,-375.13 851.87,-375.13 851.87,-391.51 863.69,-391.51
  region net GND: 894.24,-375.13 882.43,-375.13 882.43,-391.51 894.24,-391.51
  region net GND: 1031.11,-406.8 1016.54,-406.8 1016.54,-426.95 1031.11,-426.95
  rectangle net GND: 724.53,-438.79 749.53,-414.67
  rectangle net eMMC_CMD: 2242.06,-227.4 2253.79,-210.4
  pour cut-out: 1803.17,164.37 1807.18,160.36 1814.38,160.36 1878.19,224.17 1903.61,198.75 1804.23,99.36 1702.48,99.36 1674.17,71.05 1555.75,71.05 1544.16,82.64 1544.16,237.59 1549.73,243.16 1606.2,243.16 1628.84,220.53 1717.06,220.53 1738.11,199.48 1797.71,199.48 1803.17,194.02
  pour cut-out: 2302.24,114.17 2452.67,-36.26 3086.16,-36.26 3155.04,32.62 3155.04,637.24 3080.31,711.98 2468.01,711.98 2302.24,546.21
  region net VCCIO_WL: 1267.31,651.51 1296.42,651.51 1308.36,639.57 1350.12,639.57 1350.12,619.88 1308.51,619.88 1295.47,606.85 1267.31,606.85
  pour cut-out: 1053.88,-357.42 1053.88,8.99 687.55,8.99 687.55,-357.42
  pour cut-out: 433.33,-95.95 635.1,-95.95 635.1,-16.54 433.33,-16.54
  pour cut-out: 468.8,-458.27 454.16,-454.35 437.45,-443.18 433.33,-439.6 433.33,-153.34 632.19,-153.34 632.19,-330.35 660.11,-330.35 660.11,-338.27 601.31,-338.27 601.31,-458.27
  pour cut-out: 2701.19,-288.2 2854.92,-288.2 2854.92,-193.95 2701.19,-193.95
  pour cut-out: 566.38,53.15 735.07,53.15 735.07,287.71 567.01,287.71 566.38,287.08
  pour cut-out: 2104.27,743.69 2214.22,743.69 2613.87,344.04 2133.39,-136.44 1678.77,318.19
  pour cut-out: 2395.35,-93.33 2395.35,-90.26 2236.96,-90.26 2236.96,-93.33
  pour cut-out: 2124.99,-175.63 2215.1,-175.63 2215.1,-138.63 2124.99,-138.63
  pour cut-out: 2464.96,-182.25 2471.85,-182.25 2471.85,-68.24 2464.96,-68.24
  pour cut-out: 1538.27,722.53 1538.27,694.68 1858.01,694.68 1858.01,722.53
  pour cut-out: 1868.13,507.94 1814.79,561.27 1615.19,361.67 1668.53,308.34
  pour cut-out: 1408.83,493.24 1450.9,493.24 1450.9,595.18 1408.83,595.18
  pour cut-out: 1256.71,241.73 1256.71,252.17 1293.36,252.17 1293.36,379.45 792.98,379.45 792.98,241.73
  pour cut-out: 1253.55,801.57 1361.62,801.57 1361.62,323.82 1253.55,323.82
  pour cut-out: 792.98,707.73 792.98,801.57 1293.36,801.57 1293.36,707.73
PWR-1:
  rectangle net VCCIO_WL: 1260.37,605.45 1302.27,656.92
  region net VCC3V3_PMU: 1467.7,-190.35 1482.7,-175.35 1462.69,-155.33 1447.68,-170.33
PWR-2:
  rectangle net VCC3V3_SYS: 1708.47,61.26 1719.15,87.33
  region net VCC3V3_SYS: 1704.65,54.31 1719.4,55.86 1717.59,73.02 1702.85,71.47
  pour cut-out: 1627.99,535.03 ccw(c1640.39,535.03) 1640.39,522.63 ccw(c1640.39,535.03) 1652.79,535.03 ccw(c1640.39,535.03) 1640.39,547.43 ccw(c1640.39,535.03)
Bottom Layer:
  rectangle net VCC_1V2: 811.36,-441.73 833.32,-407.86
  rectangle net NetC292_1: 1126.89,-342.41 1181.22,-321.49
  rectangle net NetC292_1: 1114.43,-362.29 1139.39,-290.77
  rectangle net NetC292_1: 1072.1,-308.77 1139.39,-290.77
  rectangle net NetL11_1: 1216.5,-176.6 1278.69,-42.79
  rectangle net VCC_1V2: 1072.1,-176.6 1188.14,-105.09
  rectangle net G13_VCONN2_EN: 796.42,392.33 824.72,435.64
  rectangle net VCC_WL: 1260.37,686.31 1341.51,779.61
  rectangle net VCC_1V2: 1117.55,-278.89 1147.6,-168.94
  rectangle net VCC_1V2: 1047.63,-278.89 1147.39,-252.34
  region net VCC5V_USB: 1761.68,-292.92 1761.68,-310.92 1872.28,-310.92 1872.28,-292.92
  rectangle net VCC5V_USB: 1818.91,-365.34 1872.28,-288.17
  rectangle net VCC5V_USB: 1761.68,-310.92 1885.98,-287.21
  rectangle net VCC5V_USB: 1818.91,-343.44 1885.98,-287.21
  rectangle net USB_D_N: 655.12,139.44 676.77,168.52
  rectangle net USB2.0_D_P: 1917.25,-372.99 1946.14,-351.34
  rectangle net USB2.0_D_N: 1877.54,-372.99 1905.44,-351.34
  rectangle net SDMMC1_D3: 1027.62,340.11 1068.31,363.73
  rectangle net NetR38_1: 692.29,-55.09 777.47,-31.46
  rectangle net NetR11_2: 691.74,-5.09 777.47,18.54
  rectangle net NetL11_1: 1235.48,-251.06 1269.69,-42.44
  rectangle net NetL1_2: 1205.99,330.58 1284.73,371.45
  rectangle net NetC254_1: 3113.69,-307.25 3179.85,-254.07
  rectangle net NetC36_2: 1509.68,304.71 1527.68,417.53
  rectangle net NetC10_2: 943.17,-377.27 1037.66,-121.57
  rectangle net NetC10_2: 919.64,-377.27 1037.66,-251.28
  rectangle net HDMITX_CEC: 2550.54,-447.85 2558.42,-413.36
  rectangle net VDD_GPU: 1827.36,95.03 1841.01,135.03
  rectangle net VDD_GPU: 1825.18,78.88 1843.18,107.53
  rectangle net VCCIO_WL: 1260.37,594.19 1330.12,669.73
  rectangle net VCCIO_WL: 1167.7,707.28 1190.36,734.42
  rectangle net VCCIO_WL: 955.52,588.14 1062.62,621.98
  rectangle net VCCIO_ACODEC: 1519.38,-165.53 1528.04,-145.21
  rectangle net VCCA1V8_IMAGE: 1767.46,82.91 1777.78,99.18
  rectangle net VCCA1V8_IMAGE: 1742.65,94.53 1777.78,119.53
  rectangle net VCCA1V8_IMAGE: 1742.65,90.73 1777.78,119.53
  rectangle net VCC_DDR: 3118.82,12.53 3171.41,98.85
  rectangle net VCC_DDR: 3071.77,12.53 3171.41,47.53
  rectangle net VCC_DDR: 2952.36,12.53 2992.36,47.53
  rectangle net VCC_DDR: 1501.68,-370.91 1586.45,-279.27
  rectangle net VCC_DDR: 1501.68,-370.91 1641.86,-329.97
  rectangle net VCC_3V3: 2566.29,-447.85 2580.07,-436.02
  rectangle net VCC_1V8: 1346.89,594.19 1397.36,651.51
  rectangle net VCC5V0_SYS: 2515.11,-289.34 2544.64,-256.98
  rectangle net VCC3V3_SYS: 1721.13,53.48 1725.06,68.58
  rectangle net VCC3V3_SYS: 1595.18,-265.47 1641.86,-228.17
  rectangle net VCC3V3_SYS: 3037.22,-401.41 3083.57,-299.1
  rectangle net VCC3V3_SYS: 3037.22,-405.82 3107.71,-348.82
  rectangle net VCC3V3_SYS: 1491.82,-164.75 1500.48,-145.21
  rectangle net VCC3V3_SYS: 1595.18,-265.47 1606.39,-187.05
  rectangle net VCC3V3_SYS: 1442.68,186.07 1477.68,216.07
  rectangle net VCC3V3_SYS: 1425.67,186.07 1477.68,226.42
  rectangle net VCC3V3_SYS: 1340.01,-75.27 1367.49,-22.94
  rectangle net VCC3V3_SYS: 1277.47,-363.29 1371.36,-285.65
  rectangle net VCC3V3_SYS: 1228.89,-363.29 1371.36,-310.12
  rectangle net VCC0V6_DDR: 2874.86,709.36 2944.86,736.86
  rectangle net NetL10_1: 3059.94,-240.04 3101.75,-152.53
  rectangle net NetC5_2: 1205.99,273.03 1291.03,306.49
  rectangle net NetC5_2: 1209.22,237.9 1234.22,292.56
  rectangle net NetC5_2: 1205.99,237.9 1316.22,306.49
  rectangle net GND: 3124.22,-104.53 3247.36,-74.53
  rectangle net GND: 2965.52,-394.08 3019.35,-359.08
  region net GND: 1588.36,125.27 1588.36,72.71 1596.94,72.71 1596.94,125.27
  rectangle net GND: 1877.54,-406.45 1905.44,-384.8
  rectangle net GND: 1917.25,-406.45 1946.14,-384.8
  region net GND: 1491.9,125.27 1491.9,72.71 1500.48,72.71 1500.48,125.27
  region net GND: 1574.58,125.27 1574.58,72.71 1583.16,72.71 1583.16,125.27
  rectangle net GND: 1416.03,40.9 1468.59,49.48
  rectangle net GND: 688.58,139.44 710.24,168.52
  rectangle net GND: 1031.94,60.7 1052.79,77.44
  rectangle net GND: 643.46,-5.78 670.81,19.22
  region net GND: 647.13,-4.76 647.13,16.08 640.04,16.08 640.04,-4.76
  rectangle net GND: 1202.08,-289.83 1259.01,-257.77
  rectangle net GND: 1202.08,-280.59 1225.7,-207.76
  rectangle net GND: 868.22,-105.09 1037.66,-81.46
  rectangle net GND: 448.03,-238.82 508.17,-81.46
  rectangle net GND: 448.03,-418.27 669.31,-358.23
  pour cut-out: 819.36,-382.84 921.07,-382.84 921.07,-360.52 819.36,-360.52
  pour cut-out: 959.24,-55.09 1146.78,-55.09 1146.78,42.31 959.24,42.31
  pour cut-out: 1187.18,-182.01 1219.63,-182.01 1219.63,-42.79 1187.18,-42.79
  region net NetR10_1: 1657.18,125.27 1657.18,141.03 1664.96,148.81 1668.03,145.74 1668.03,144.83 1665.44,142.24 1665.84,141.85 1665.84,125.27
  region net NetC33_2: 1643.4,125.27 1643.4,141.03 1651.18,148.81 1654.25,145.74 1654.25,144.83 1651.67,142.24 1652.06,141.85 1652.06,125.27
  region net VCC3V3_SYS: 1657.58,221.46 1657.58,164.67 1685.42,190.68 1694.55,199.81 1694.55,221.46
  region net VCC3V3_SYS: 1497.8,151.98 1505.6,144.17 1505.6,109.52 1514.26,109.52 1514.26,153.89 1506.98,161.17
  pour cut-out: 565.94,51.9 688.58,51.9 688.58,232.03 565.94,232.03
  pour cut-out: 934.03,-225.71 643.87,-225.71 643.87,-251.28 1037.66,-251.28 1037.66,-115.52 934.03,-115.52
  pour cut-out: 786.56,25.52 675.82,25.52 675.82,-31.46 782.47,-31.46 782.47,-229.95 792.55,-229.95 792.55,25.52
  pour cut-out: 1496.19,-376.32 1598.68,-376.32 1598.68,-265.47 1496.19,-265.47
  pour cut-out: 2465.41,-218.14 2632.14,-218.14 2632.14,-19.46 2465.41,-19.46
  pour cut-out: 1684.31,534.77 1804.51,534.77 1804.51,590.55 1684.31,590.55
  pour cut-out: 982.46,243.2 1289.73,243.2 1289.73,421.49 982.46,421.49
  pour cut-out: 567.33,230.61 702.18,230.61 702.18,328.79 567.33,328.79
  pour cut-out: 2313.83,142.9 2314.64,142.09 2314.64,135.13 2469.74,-19.97 3142.35,-19.97 3142.35,633.66 3073.08,702.94 2452.65,702.94 2313.83,564.12
  pour cut-out: 2162.35,-282.47 2421.92,-282.47 2421.92,-50.73 2162.98,-50.73 2162.35,-51.36

## Silkscreen, mask and mechanical layers (free items; w line width, h text height)
Top Overlay:
  drawing of 61 lines, arcs and shapes, not listed
  text "RCY" at 3138.39,551.55 h30 r90
  text "PWR" at 3138.39,355.8 h30 r90
  text "S" at 560.29,308.65 h50
  text "S" at 586.9,308.47 h50
  text "RST" at 3143.37,159.82 h30 r90
  text "4K" at 2906.53,-137.24 h50
  text "2.0" at 1964.17,-253.64 h50
  text "D0" at 2169.78,-361.94 h40
  text "5V0" at 503.53,-378.43 h40 r90
  text "3V3" at 560.18,-378.43 h40 r90
  text "GND" at 616.84,-378.43 h40 r90
  text "GND" at 2290.66,-378.43 h40 r90
  text "RX" at 2365.59,-378.43 h40 r90
  text "ST-B" at 1191.54,-383.43 h40 r90
  text "U-TX" at 1257.33,-383.43 h40 r90
  text "SCL" at 1327.89,-383.43 h40 r90
  text "SDA" at 1396.4,-383.43 h40 r90
  text "TX" at 2447.5,-383.43 h40 r90
Bottom Overlay:
  text "TRANSMITTER" at 636.19,445.96 h60 r270
  text "4K" at 635.63,365.47 h60 r270
Dimensions:
  drawing of 659 lines, arcs and shapes, not listed
  text "Layer" at 567.85,5981.73 h60
  text "Name" at 977.76,5981.73 h60
  text "Material" at 1907.5,5981.73 h60
  text "Thickness" at 2507.36,5981.73 h60
  text "Constant" at 3157.19,5981.73 h60
  text "Board Layer Stack" at 3727.05,5981.73 h60
  text "Top Overlay" at 977.76,5861.73 h60
  text "Top Solder" at 977.76,5741.73 h60
  text "SM-001" at 1907.5,5741.73 h60
  text "0.025mm" at 2507.36,5741.73 h60
  text "4" at 3157.19,5741.73 h60
  text "1" at 567.85,5621.73 h60
  text "Top Layer" at 977.76,5621.73 h60
  text "0.035mm" at 2507.36,5621.73 h60
  text "Dielectric 1" at 977.76,5501.73 h60
  text "PP-007" at 1907.5,5501.73 h60
  text "0.076mm" at 2507.36,5501.73 h60
  text "4.2" at 3157.19,5501.73 h60
  text "2" at 567.85,5381.73 h60
  text "GND-1" at 977.76,5381.73 h60
  text "CF-004" at 1907.5,5381.73 h60
  text "0.035mm" at 2507.36,5381.73 h60
  text "Dielectric 2" at 977.76,5261.73 h60
  text "PP-007" at 1907.5,5261.73 h60
  text "0.076mm" at 2507.36,5261.73 h60
  text "4.2" at 3157.19,5261.73 h60
  text "Dielectric 3" at 977.76,5141.73 h60
  text "PP-007" at 1907.5,5141.73 h60
  text "0.076mm" at 2507.36,5141.73 h60
  text "4.2" at 3157.19,5141.73 h60
  text "3" at 567.85,5021.73 h60
  text "Signal L1" at 977.76,5021.73 h60
  text "CF-004" at 1907.5,5021.73 h60
  text "0.035mm" at 2507.36,5021.73 h60
  text "Core 1" at 977.76,4901.73 h60
  text "Core-024" at 1907.5,4901.73 h60
  text "0.203mm" at 2507.36,4901.73 h60
  text "4.6" at 3157.19,4901.73 h60
  text "4" at 567.85,4781.73 h60
  text "GND-2" at 977.76,4781.73 h60
  text "CF-004" at 1907.5,4781.73 h60
  text "0.035mm" at 2507.36,4781.73 h60
  text "Dielectric 4" at 977.76,4661.73 h60
  text "PP-1080" at 1907.5,4661.73 h60
  text "0.075mm" at 2507.36,4661.73 h60
  text "4" at 3157.19,4661.73 h60
  text "5" at 567.85,4541.73 h60
  text "PWR-1" at 977.76,4541.73 h60
  text "CF-004" at 1907.5,4541.73 h60
  text "0.035mm" at 2507.36,4541.73 h60
  text "Core 2" at 977.76,4421.73 h60
  text "Core-024" at 1907.5,4421.73 h60
  text "0.203mm" at 2507.36,4421.73 h60
  text "4.6" at 3157.19,4421.73 h60
  text "6" at 567.85,4301.73 h60
  text "PWR-2" at 977.76,4301.73 h60
  text "CF-004" at 1907.5,4301.73 h60
  text "0.035mm" at 2507.36,4301.73 h60
  text "Dielectric 5" at 977.76,4181.73 h60
  text "PP-1080" at 1907.5,4181.73 h60
  text "0.075mm" at 2507.36,4181.73 h60
  text "4" at 3157.19,4181.73 h60
  text "7" at 567.85,4061.73 h60
  text "GND-3" at 977.76,4061.73 h60
  text "CF-004" at 1907.5,4061.73 h60
  text "0.035mm" at 2507.36,4061.73 h60
  text "Core 3" at 977.76,3941.73 h60
  text "Core-024" at 1907.5,3941.73 h60
  text "0.203mm" at 2507.36,3941.73 h60
  text "4.6" at 3157.19,3941.73 h60
  text "8" at 567.85,3821.73 h60
  text "Signal L2" at 977.76,3821.73 h60
  text "CF-004" at 1907.5,3821.73 h60
  text "0.035mm" at 2507.36,3821.73 h60
  text "Dielectric 6" at 977.76,3701.73 h60
  text "PP-007" at 1907.5,3701.73 h60
  text "0.076mm" at 2507.36,3701.73 h60
  text "4.2" at 3157.19,3701.73 h60
  text "Dielectric 7" at 977.76,3581.73 h60
  text "PP-007" at 1907.5,3581.73 h60
  text "0.076mm" at 2507.36,3581.73 h60
  text "4.2" at 3157.19,3581.73 h60
  text "9" at 567.85,3461.73 h60
  text "GND-4" at 977.76,3461.73 h60
  text "CF-004" at 1907.5,3461.73 h60
  text "0.035mm" at 2507.36,3461.73 h60
  text "Dielectric 8" at 977.76,3341.73 h60
  text "PP-007" at 1907.5,3341.73 h60
  text "0.076mm" at 2507.36,3341.73 h60
  text "4.2" at 3157.19,3341.73 h60
  text "10" at 567.85,3221.73 h60
  text "Bottom Layer" at 977.76,3221.73 h60
  text "0.035mm" at 2507.36,3221.73 h60
  text "Bottom Solder" at 977.76,3101.73 h60
  text "SM-001" at 1907.5,3101.73 h60
  text "0.025mm" at 2507.36,3101.73 h60
  text "4" at 3157.19,3101.73 h60
  text "Bottom Overlay" at 977.76,2981.73 h60
  text "Total board thickness:" at 567.85,2861.73 h60
  text "1.618mm" at 2507.36,2861.73 h60
Board Outline:
  the board outline again, w7
Drill Drawing:
  circle w10: c597.98,2304 r33.33
  lines w10: 564.65,1970.67 631.31,1970.67 631.31,2037.34 564.65,2037.34 564.65,1970.67 ; 564.65,2187.34 631.31,2187.34 597.98,2120.67 564.65,2187.34 ; 564.65,2437.34 581.31,2437.34 597.98,2420.67 614.65,2437.34 631.31,2437.34 614.65,2454 631.31,2470.67 614.65,2470.67 597.98,2487.34 581.31,2470.67 564.65,2470.67 581.31,2454 564.65,2437.34
  lines w15: 504.86,1925.67 11185.89,1925.67 ; 504.86,2525.67 11185.89,2525.67 ; 1055.73,1775.67 1055.73,2675.67 ; 1705.56,1775.67 1705.56,2675.67 ; 2795.24,1775.67 2795.24,2675.67 ; 3301.12,1775.67 3301.12,2675.67 ; 4034.92,1775.67 4034.92,2675.67 ; 5534.47,1775.67 5534.47,2675.67 ; 6124.32,1775.67 6124.32,2675.67 ; 6870.11,1775.67 6870.11,2675.67 ; 7619.91,1775.67 7619.91,2675.67 ; 8473.67,1775.67 8473.67,2675.67 ; 9807.28,1775.67 9807.28,2675.67 ; 504.86,1775.67 11185.89,1775.67 11185.89,2675.67 504.86,2675.67 504.86,1775.67
  text "Symbol" at 594.86,2570.67 h72
  text "Count" at 1100.73,2570.67 h72
  text "Hole Size" at 1750.56,2570.67 h72
  text "Plated" at 2840.24,2570.67 h72
  text "Hole Type" at 3346.12,2570.67 h72
  text "Drill Layer Pair" at 4079.92,2570.67 h72
  text "Via/Pad" at 5579.47,2570.67 h72
  text "Pad Shape" at 6169.32,2570.67 h72
  text "Template" at 6915.11,2570.67 h72
  text "Description" at 7664.91,2570.67 h72
  text "Hole Tolerance (+)" at 8518.67,2570.67 h72
  text "Hole Tolerance (-)" at 9852.28,2570.67 h72
  text "2" at 1100.73,2420.67 h60
  text "19.69mil (0.500mm)" at 1750.56,2420.67 h60
  text "PTH" at 2840.24,2420.67 h60
  text "Slot" at 3346.12,2420.67 h60
  text "Top Layer - Bottom Layer" at 4079.92,2420.67 h60
  text "Pad" at 5579.47,2420.67 h60
  text "Rounded" at 6169.32,2420.67 h60
  text "(Mixed)" at 6915.11,2420.67 h60
  text "12" at 1100.73,2270.67 h60
  text "19.69mil (0.500mm)" at 1750.56,2270.67 h60
  text "PTH" at 2840.24,2270.67 h60
  text "Round" at 3346.12,2270.67 h60
  text "Top Layer - Bottom Layer" at 4079.92,2270.67 h60
  text "Pad" at 5579.47,2270.67 h60
  text "Rounded" at 6169.32,2270.67 h60
  text "(Mixed)" at 6915.11,2270.67 h60
  text "248" at 1100.73,2120.67 h60
  text "7.87mil (0.200mm)" at 1750.56,2120.67 h60
  text "PTH" at 2840.24,2120.67 h60
  text "Round" at 3346.12,2120.67 h60
  text "Top Layer - Bottom Layer" at 4079.92,2120.67 h60
  text "Via" at 5579.47,2120.67 h60
  text "Rounded" at 6169.32,2120.67 h60
  text "v40h20m0mx0" at 6915.11,2120.67 h60
  text "742" at 1100.73,1970.67 h60
  text "5.91mil (0.150mm)" at 1750.56,1970.67 h60
  text "PTH" at 2840.24,1970.67 h60
  text "Round" at 3346.12,1970.67 h60
  text "Top Layer - Bottom Layer" at 4079.92,1970.67 h60
  text "Via" at 5579.47,1970.67 h60
  text "Rounded" at 6169.32,1970.67 h60
  text "(Mixed)" at 6915.11,1970.67 h60
  text "1004 Total" at 1100.73,1820.67 h60
  text "Slot definitions :" at 594.86,1675.69 h60
  text "Routed Path Length" at 1627.55,1675.69 h60
  text "= Calculated from tool start centre position to tool end centre position." at 2730.21,1675.69 h60
  text "Hole Length" at 1627.55,1575.72 h60
  text "= Routed Path Length + Tool Size = Slot length as defined in the PCB layout" at 2320.34,1575.72 h60

## Dimensions
473.88,801.57 to 473.88,-458.27 on Dimensions
3257,171.83 to 422.36,750.05 on Dimensions